# Altium PCB PCB-Powermodule-v11.0.0.PcbDoc (part 5 of 5)
Units mil, origin at the board's own origin, x right, y up, seen from the top; angles counter-clockwise.
Board outline 3031.5 x 1495.87 mil, 4 copper layers (Top Layer, Ground, Power, Bottom Layer), stack 61.653 mil thick; 227 components, 160 nets, 893 pads, 326 vias.
Unrouted connection lines stored in the file: 45.
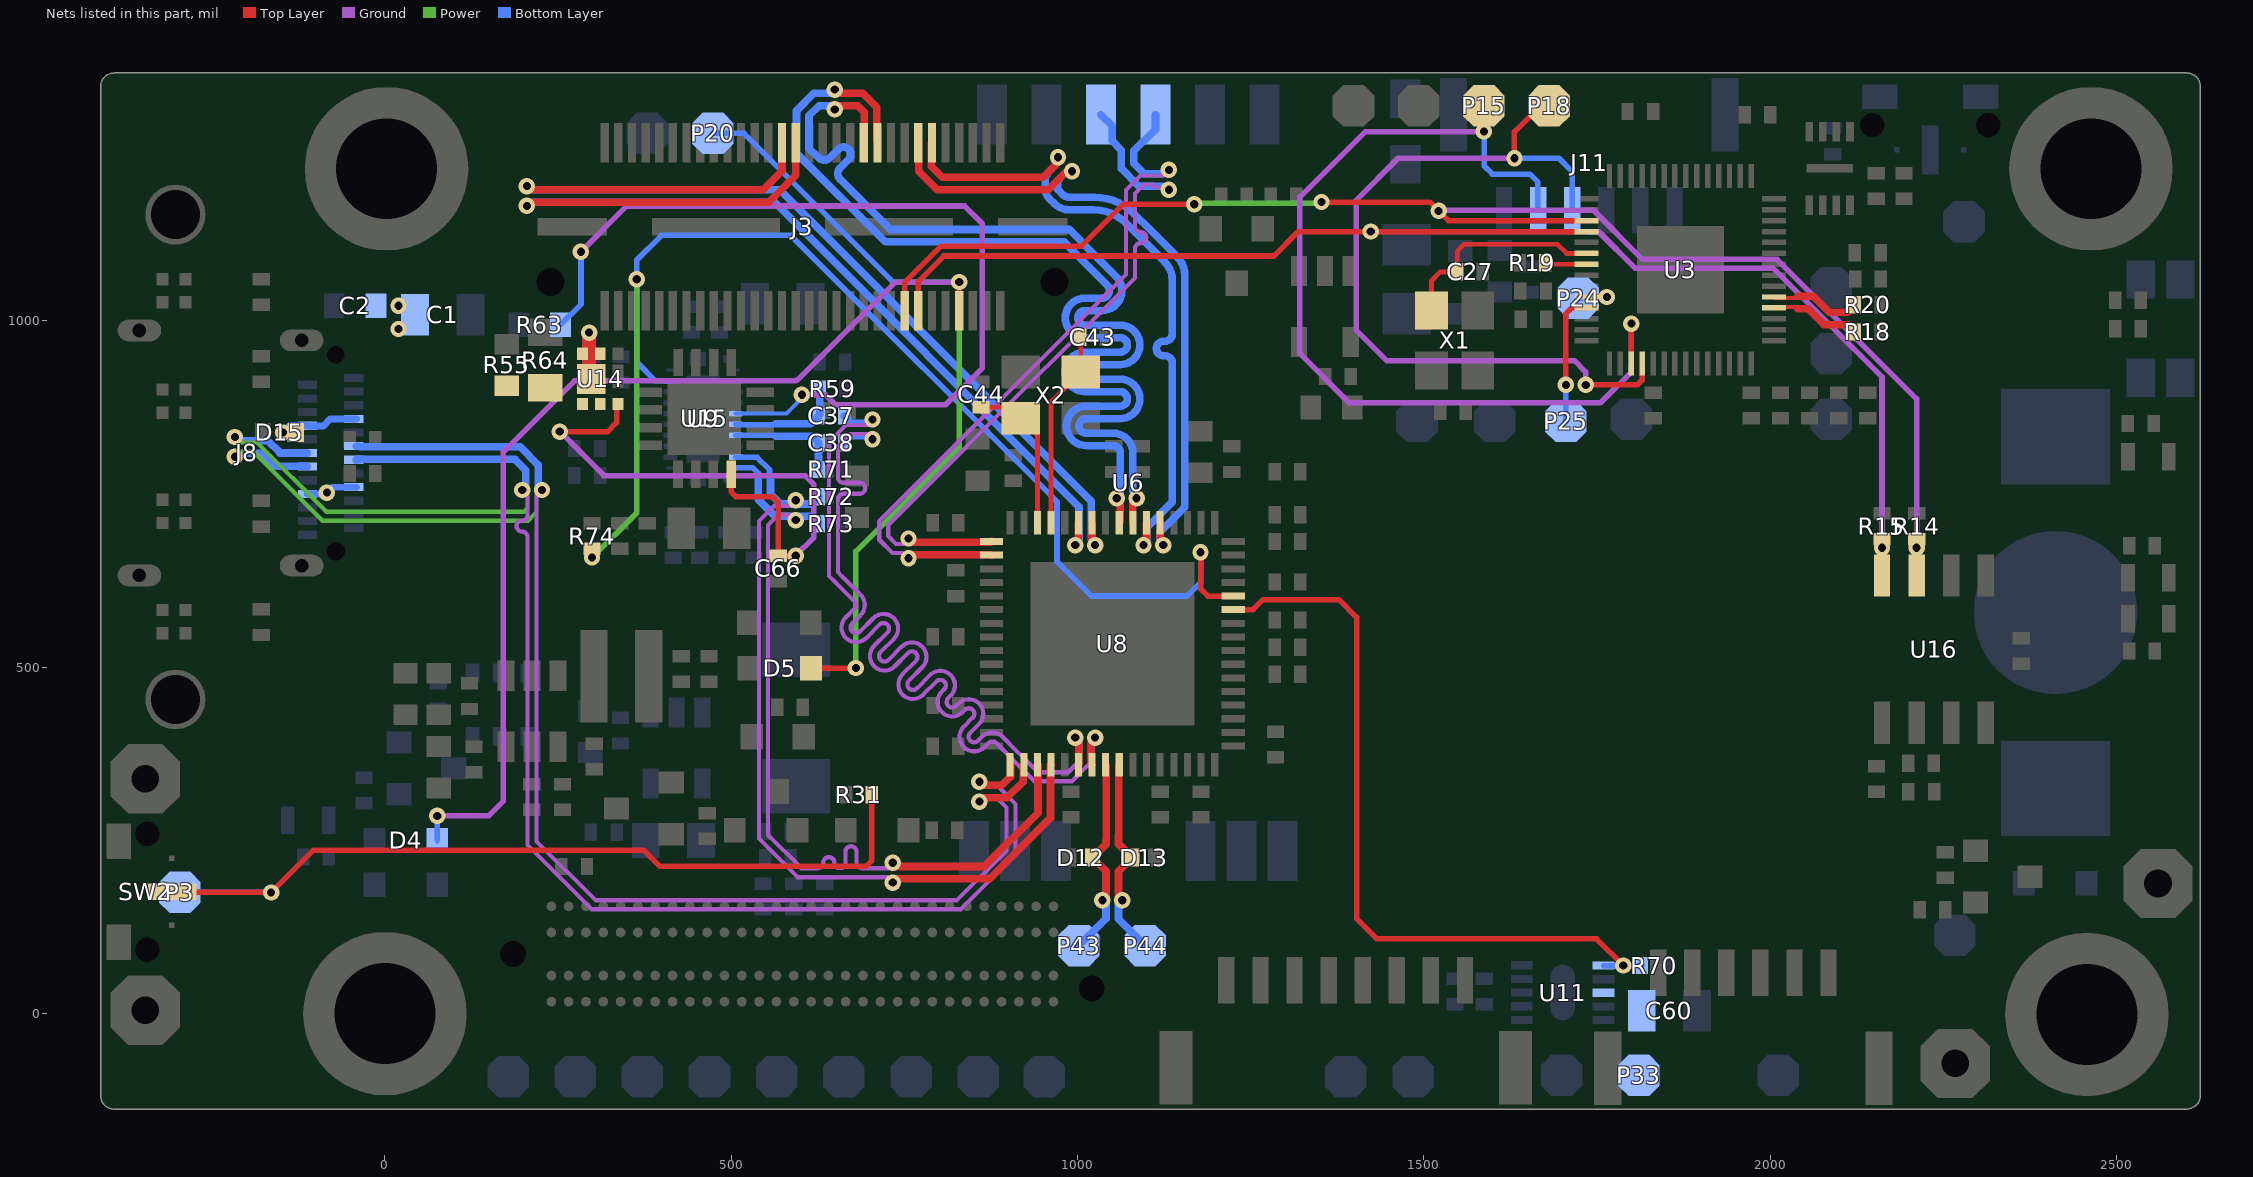
[diagram p5: the nets of this part, all layers, seen from the top]

## Via types
v1: diameter 23.62, hole 11.81, Top Layer to Bottom Layer, tented both sides, 326 vias

## Nets (pads, with @x,y where several pads share a name; then routed paths per layer and width w, separated by ;. In a path a pad name is that pad's centre, name@x,y a point inside that pad or via, vN(x,y) a via of type N, cw(c..) or ccw(c..) an arc to the next point about the centre after c; other vN are vias at no path point) (continued)
SCL0: J11.3 P18.1 U3.32 | length 1171.7
  Top Layer w8: v1(1630.78,1234.96) 1630.78,1273.16 1668.13,1310.5 P18.1@1680.78,1310.5 ; v1(1733.62,907.75) 1808.42,907.75 1809.46,908.8 1809.46,909.27 1814.74,914.55 1815.22,914.55 U3.32@1815.22,938.69
  Ground w8: v1(1630.78,1234.96) 1462.84,1234.96 1402.43,1174.55 1402.43,986.47 1446.09,942.81 1717.15,942.81 1733.62,926.34 v1(1733.62,907.75)
  Bottom Layer w8: v1(1630.78,1234.96) 1694.91,1234.96 1714.1,1215.77 J11.3@1714.1,1164.02
SCL_VOXL: J3.13 R15.1 U3.18 U16.8 | length 2109.6
  Top Layer w8: J3.13@770.1,1014.6 770.1,1056.82 807.12,1093.84 1283.34,1093.84 1318.32,1128.82 1423.15,1128.82 v1@1423.36,1129.04 ; v1(1423.24,1129.17) v1@1423.36,1129.04 ; U3.18@1734.98,1129.17 1423.49,1129.17 v1@1423.36,1129.04
  Ground w8: v1(1423.24,1129.17) 1423.49,1129.17 v1@1423.49,1128.82 ; v1@1423.49,1128.25 v1@1423.49,1128.82 ; v1(2161.39,672.71) 2161.39,919.23 2004.64,1075.98 1805.33,1075.98 1752.48,1128.82 v1@1423.49,1128.82
SDA0: J11.2 P15.1 U3.31 | length 1399.1
  Top Layer w8: v1(1586.64,1273.5) P15.1@1586.64,1310.5 ; U3.31@1799.47,938.69 1799.53,938.76 v1(1799.53,996.17)
  Ground w8: v1(1586.64,1273.5) 1415.42,1273.5 1321,1179.08 1321,953.1 1392.1,882 1755,882 1799.53,926.53 v1(1799.53,996.17)
  Bottom Layer w8: v1(1586.64,1273.5) 1587.16,1272.98 1587.16,1223.7 1598.77,1212.08 1652.96,1212.08 1664.44,1200.6 1664.44,1160.25 J11.2@1664.88,1159.82
SDA_VOXL: J3.15 R14.1 U3.17 U16.7 | length 2155.6
  Top Layer w8: J3.15@750.42,1014.6 750.42,1055.52 803.14,1108.25 1005.8,1108.25 1066.23,1168.67 v1(1168.39,1168.67) ; v1(1352.2,1171.77) 1508.53,1171.77 v1(1521.3,1159) 1535.39,1144.91 U3.17@1734.98,1144.91 ; U16.7@2211.39,632.68 v1(2211.39,672.71) R14.1@2211.39,685.21
  Ground w8: v1(1521.3,1159) 1522.4,1160.09 1744.48,1160.09 1815.6,1088.98 2010.02,1088.98 2211.39,887.61 v1(2211.39,672.71)
  Power w8: v1(1168.39,1168.67) 1169.93,1170.22 1350.65,1170.22 v1(1352.2,1171.77)
SW_PWR: P3.1 R31.1 SW2.2 | length 1276
  Top Layer w8: SW2.2@-307.48,176 -306.48,175 v1(-164.35,175) -103.61,235.74 374.05,235.74 397.29,212.5 694.52,212.5 702.93,220.91 R31.1@702.93,316.17
  Bottom Layer w8: P3.1@-296,175 v1(-164.35,175)
SWCLK: P24.1 U3.24 | length 68.8
  Top Layer w8: U3.24@1738.97,1034.68 v1(1764.17,1034.68)
  Bottom Layer w8: P24.1@1722.75,1033.15 1723.23,1032.68 1764.17,1032.68 v1(1764.17,1034.68)
SWDIO: P25.1 U3.25 | length 189.1
  Top Layer w8: v1(1705,907.75) 1705,1010.71 1713.22,1018.93 U3.25@1734.98,1018.93
  Bottom Layer w8: P25.1@1705,855 v1(1705,907.75)
TPS2591_G: C66.2 U14.3 U15.4 | length 828.6
  Top Layer w8: v1(252.53,840.28) 252.84,839.96 321.12,839.96 334.53,853.37 U14.3@334.53,880.12 ; U15.4@499.95,778.68 499.95,753.12 506.56,746.51 559.97,746.51 567.82,738.66 C66.2@567.82,661.18 v1(593.06,661.18)
  Ground w8: v1(252.53,840.28) 316.09,776.71 606.55,776.71 619.24,764.02 619.24,687.36 v1(593.06,661.18)
USB3_RX0_N: C37.1 U8.23 | length 1263.1
  Top Layer w11: U8.23@1020.85,359.37 1020.01,360.21 1020.01,393.24 v1(1025.32,398.55)
  Ground w6: v1(704,857.87) 696.19,850.05 665.95,850.05 641.06,825.16 641.06,632.01 650.25,622.82 655.06,618.01 677.44,595.63 cw(c671.82,589.94) 677.47,584.28 665.42,572.23 ccw(c680.25,557.36) 665.4,542.51 ccw(c680.25,557.36) 695.1,542.51 714.27,561.68 cw(c719.9,556) 725.56,550.34 706.44,531.22 ; 706.41,531.19 ccw(c721.26,516.35) 706.41,501.5 ccw(c721.26,516.35) 736.11,501.5 755.28,520.67 cw(c760.91,514.99) 766.57,520.64 cw(c760.91,514.99) 766.57,509.33 747.45,490.21 ; 747.4,460.5 cw(c762.27,475.33) 747.42,490.18 ; 747.44,460.47 ccw(c762.27,475.33) 777.12,460.48 796.29,479.66 cw(c801.92,473.97) 807.58,479.63 cw(c801.92,473.97) 807.58,468.32 804.21,464.94 ; 804.16,435.24 cw(c819.03,450.07) 804.18,464.92 ; 804.2,435.2 ccw(c819.03,450.07) 833.88,435.22 837.3,438.64 cw(c842.94,432.96) 848.59,438.62 cw(c842.94,432.96) 848.59,427.31 835.82,414.53 ccw(c850.66,399.68) 835.8,384.85 ; 835.83,384.81 ccw(c850.66,399.68) 865.51,384.83 871.22,390.54 cw(c876.88,384.88) 882.55,390.52 904.28,368.79 909.09,363.98 937.57,335.5 991.89,335.5 1017.51,361.12 1017.51,390.74 v1(1025.32,398.55)
  Bottom Layer w11: C37.1@663.06,862.89 673.39,852.55 698.69,852.55 v1(704,857.87)
USB3_RX0_P: C38.1 U8.22 | length 1263.7
  Top Layer w11: v1(996.7,398.55) 1002.01,393.24 1002.01,360.21 U8.22@1001.17,359.37
  Ground w6: v1(704,829.24) 696.19,837.05 671.34,837.05 654.06,819.78 654.06,804.7 654.06,774.48 ccw(c662.06,774.48) 662.06,766.48 685.4,766.48 cw(c685.4,758.48) 685.4,750.48 662.06,750.48 ccw(c662.06,742.48) 654.06,742.48 654.06,723.48 654.06,637.4 659.44,632.01 664.26,627.2 686.67,604.79 688.57,602.88 688.57,602.6 cw(c671.82,589.94) 686.67,575.09 674.57,562.99 ccw(c680.25,557.36) 674.59,551.7 ccw(c680.25,557.36) 685.9,551.7 705.02,570.82 ; 705.05,570.85 cw(c719.9,556) 732.56,572.75 732.85,572.75 734.74,570.85 ; 734.75,570.84 736.65,568.94 736.65,568.66 cw(c719.9,556) 734.75,541.15 715.58,521.98 ccw(c721.26,516.35) 715.6,510.69 ccw(c721.26,516.35) 726.92,510.69 746.04,529.81 cw(c760.91,514.99) 775.76,529.84 cw(c760.91,514.99) 775.76,500.14 756.59,480.97 ccw(c762.27,475.33) 767.93,469.68 787.05,488.8 cw(c801.92,473.97) 816.77,488.82 cw(c801.92,473.97) 816.77,459.13 813.35,455.7 ccw(c819.03,450.07) 824.69,444.41 828.06,447.79 ; 828.09,447.81 cw(c842.94,432.96) 857.78,447.81 cw(c842.94,432.96) 857.78,418.11 845.01,405.34 ccw(c850.66,399.68) 856.32,394.02 862.03,399.73 cw(c876.88,384.88) 889.54,401.63 889.82,401.63 891.72,399.73 913.47,377.98 918.28,373.17 942.95,348.5 986.51,348.5 1004.51,366.5 1004.51,390.74 v1(996.7,398.55)
  Bottom Layer w11: C38.1@663.06,824.22 673.39,834.55 698.69,834.55 v1(704,829.24)
USB3_RX0C_N: C37.2 R59.1 U9.6 | length 164.6
  Bottom Layer w8: U9.6@506.54,850.67 506.91,850.29 563.17,850.29 564.67,851.79
  Bottom Layer w11: 564.67,851.79 614.96,851.79 C37.2@626.06,862.89 627.8,864.63 R59.1@627.8,901.85
USB3_RX0C_P: C38.2 R71.1 U9.7 | length 162.8
  Bottom Layer w8: U9.7@506.54,834.92 506.91,835.29 563.17,835.29 564.67,833.79
  Bottom Layer w11: 564.67,833.79 616.48,833.79 C38.2@626.06,824.22 R71.1@626.06,785.7
USB3_TX0_N: R72.1 U8.20 U9.9 | length 1263.1
  Top Layer w11: v1(733.27,189.19) 738.58,194.5 872.94,194.5 960.95,282.52 960.95,358.53 U8.20@961.8,359.37
  Ground w6: v1(593.06,741.16) 585.25,733.35 562.44,733.35 540.1,711.01 540.1,252.7 595.8,197 725.46,197 v1(733.27,189.19)
  Bottom Layer w8: U9.9@506.54,803.42 506.91,803.04 537.49,803.04 555.23,785.31 555.23,772.15 556.73,770.65
  Bottom Layer w11: 556.73,770.65 556.73,749.75 570.64,735.85 587.75,735.85 v1(593.06,741.16) 598.37,735.85 615.87,735.85 R72.1@626.24,746.22
USB3_TX0_P: R73.1 U8.19 U9.10 | length 1263.1
  Top Layer w11: v1(733.27,217.81) 738.58,212.5 865.49,212.5 942.95,289.97 942.95,358.53 U8.19@942.11,359.37
  Ground w6: v1(593.06,712.54) 585.25,720.35 567.82,720.35 553.1,705.63 553.1,258.08 601.18,210 613.5,210 624.87,210 ccw(c624.87,218) 632.87,218 cw(c640.87,218) 648.87,218 ccw(c656.87,218) 664.87,218 664.87,233.7 cw(c672.87,233.7) 680.87,233.7 680.87,218 ccw(c688.87,218) 688.87,210 707.87,210 725.46,210 v1(733.27,217.81)
  Bottom Layer w8: U9.10@506.54,787.67 506.91,788.04 531.28,788.04 540.23,779.09 540.23,772.15 538.73,770.65
  Bottom Layer w11: 538.73,770.65 538.73,742.3 563.18,717.85 587.75,717.85 v1(593.06,712.54) 598.37,717.85 615.87,717.85 R73.1@626.24,707.48
USB-WIFI_N: U6.3 U8.2 | length 1045.2
  Top Layer w11: v1(756,657.46) 761.31,662.77 874.93,662.77 U8.2@875.77,661.93
  Ground w6: v1(756,657.46) 748.19,665.27 732.62,665.27 713.7,684.19 713.7,710.95 1069.99,1067.25 1069.99,1189.21 1090.84,1210.06 1124.07,1210.06 1131.88,1217.87 v1(1131.88,1218.11)
  Bottom Layer w11: U6.3@1112.46,1297.87 1112.46,1276.21 1096.31,1260.06 1095.33,1260.06 1081.09,1245.82 1081.09,1227.69 1095.99,1212.79 1123.15,1212.79 1128.46,1218.11 v1(1131.88,1218.11)
USB-WIFI_P: U6.4 U8.1 | length 1048.8
  Top Layer w11: v1(756,686.08) 761.31,680.77 874.93,680.77 U8.1@875.77,681.62
  Ground w6: v1(756,686.08) 748.19,678.27 738,678.27 726.7,689.58 726.7,705.57 950.93,929.8 958.54,937.41 1082.99,1061.86 1082.99,1085.36 1082.99,1104.36 cw(c1090.99,1104.36) 1090.99,1112.36 1091.16,1112.36 ccw(c1091.16,1120.36) 1091.16,1128.36 1090.99,1128.36 cw(c1090.99,1136.36) 1082.99,1136.36 1082.99,1183.53 1082.99,1183.83 1096.22,1197.06 1108.07,1197.06 1112.27,1192.85 1128.51,1192.85 v1(1131.88,1189.48)
  Bottom Layer w11: U6.4@1033.72,1297.87 1049.88,1281.71 1049.88,1259.97 1063.09,1246.75 1063.09,1220.23 1088.53,1194.79 1123.15,1194.79 1128.46,1189.48 v1(1131.88,1189.48)
USB_D_N: R18.1 U3.46 | length 132.2
  Top Layer w6: U3.46@2005.69,1018.93 2007.06,1020.3 2037.01,1020.3 2039.51,1017.8
  Top Layer w11: 2039.51,1017.8 2054.65,1017.8 2077.71,994.74 2111.83,994.74 R18.1@2122.33,984.24
USB_D_P: R20.1 U3.47 | length 132.2
  Top Layer w6: U3.47@2005.69,1034.68 2007.06,1033.3 2037.01,1033.3 2039.51,1035.8
  Top Layer w11: 2039.51,1035.8 2062.1,1035.8 2085.17,1012.74 2111.83,1012.74 R20.1@2122.33,1023.24
USB_FLT2: R70.2 U8.43 U11.6 | length 1097.6
  Top Layer w8: U8.43@1224.99,583.19 1253.38,583.19 1267.95,597.76 1377.24,597.76 1403,572 1403,137.13 1432.13,108 1749.39,108 v1(1787.93,69.45)
  Bottom Layer w8: U11.6@1759.39,69.45 v1(1787.93,69.45) R70.2@1814.43,69.45
USB_HDR_D_N: D13.1 P44.1 U8.25 | length 304.3
  Top Layer w11: 1059.11,257.78 1059.11,244.93 D13.1@1078.87,225.17 1059.11,205.4 1059.11,163.71 v1(1064.42,163.71) ; 1059.38,257.78 1059.38,358.53 U8.25@1060.22,359.37
  Bottom Layer w11: 1058.92,136.97 P44.1@1097.62,98.27 ; 1059.11,137.16 1059.11,163.71 v1(1064.42,163.71)
USB_HDR_D_P: D12.1 P43.1 U8.24 | length 304.7
  Top Layer w11: v1(1035.79,163.71) 1041.11,163.71 1041.11,205.4 D12.1@1021.34,225.17 1041.11,244.93 1041.11,250.33 1041.38,250.6 1041.38,358.53 U8.24@1040.54,359.37
  Bottom Layer w11: P43.1@1001.85,98.27 1040.73,137.16 ; v1(1035.79,163.71) 1041.11,163.71 1041.11,137.16
USBC_D_N: J8.A7 J8.B7 U8.18 | length 2412.9
  Top Layer w11: v1(858.27,306.17) 863.58,311.48 898.08,311.48 921.58,334.99 921.58,358.53 U8.18@922.43,359.37
  Ground w6: v1(226.86,756.04) 219.05,748.23 219.05,248.58 303.82,163.81 826.19,163.81 897.38,235.01 897.38,297.42 880.83,313.98 866.08,313.98 v1(858.27,306.17)
  Power w6: v1(-216.55,803.92) -208.74,811.73 -190.07,811.73 -89.98,711.65 206.44,711.65 215.24,720.46 219.05,724.26 219.05,730.5 219.05,748.23 v1(226.86,756.04)
  Bottom Layer w11: v1(-216.55,803.92) -211.24,809.23 -176.57,809.23 -157.82,790.48 -112.59,790.48 J8.B7@-111.93,789.82 ; J8.A7@-41.29,819.07 -36.85,819.07 -36.11,818.32 195.24,818.32 221.55,792.02 221.55,761.35 v1(226.86,756.04)
USBC_D_P: J8.A6 J8.B6 U8.17 | length 2413.9
  Top Layer w11: v1(858.27,334.79) 863.58,329.48 890.62,329.48 903.58,342.44 903.58,358.53 U8.17@902.74,359.37
  Ground w6: v1(198.24,756.04) 206.05,748.23 206.05,738.94 206.05,719.94 cw(c198.05,719.94) 198.05,711.94 ccw(c198.05,703.94) 198.05,695.94 cw(c198.05,687.94) 206.05,687.94 206.05,627.64 206.05,243.2 298.43,150.81 831.57,150.81 910.38,229.62 910.38,302.81 886.21,326.98 866.08,326.98 v1(858.27,334.79)
  Power w6: v1(-216.55,832.54) -208.74,824.73 -184.68,824.73 -84.6,724.65 201.05,724.65 206.05,729.65 206.05,730.5 206.05,748.23 v1(198.24,756.04)
  Bottom Layer w11: v1(-216.55,832.54) -211.24,827.23 -169.11,827.23 -151.38,809.5 J8.B6@-111.93,809.5 ; J8.A6@-41.29,799.39 -40.61,800.07 -35.91,800.07 -35.65,800.32 187.79,800.32 203.55,784.56 203.55,761.35 v1(198.24,756.04)
VBUS1: C1.2 C2.1 D15.2 J8.A4 J8.A9 J8.B4 J8.B9 R55.1 R64.1 U14.1 U14.2 U14.5 U14.6 U14.8 | length 274.4
  Top Layer w10: v1(-147.08,839.03) v1(-147.08,839.03) D15.2@-128.71,839.09
  Top Layer w20: v1(294.76,983.27) 294.76,919.82 U14.8@298.14,916.44
  Bottom Layer w10: v1(-147.08,839.03) -137.24,848.87 J8.B4@-111.93,848.87 ; J8.B9@-111.93,750.18 v1@-83.79,750.18 ; J8.B4@-111.93,848.6 -88.93,848.6 -79.09,858.44 J8.A9@-41.29,858.44 ; v1(-83.79,752.23) v1(-83.79,752.23) -75.95,760.02 J8.A4@-41.29,760.02
  other v1: 19.54,988.48 19.54,1022
VBUS2: C60.2 P33.1 U11.8
VBUS_DET: R63.2 U9.5 | length 1343.2
  Ground w8.17: v1(283,1100) 348.99,1165.99 837.01,1165.99 862.52,1140.48 862.52,932.22 809.3,879 650.45,879 636.18,893.27 601.99,893.27 v1(601.99,893.4)
  Bottom Layer w6: U9.5@506.54,866.41 579.69,866.41 604.27,890.99 601.99,893.27 v1(601.99,893.4)
  Bottom Layer w8.17: R63.2@253.61,994.56 283,1023.95 v1(283,1100)
VCON_FLT: R74.2 U8.44 U9.24 | length 1899.1
  Top Layer w8: v1@299.07,654.77 v1(299.07,658.51) R74.2@299.07,667.27 ; v1(1177.56,666.25) 1177.56,613.44 1188.12,602.88 U8.44@1224.99,602.88
  Power w8: v1(299.07,658.51) 363.57,723.01 v1(363.57,1060.18)
  Bottom Layer w8: U9.24@412.06,913.66 390.63,913.66 363.57,940.72 v1(363.57,1060.18) 363.57,1088.02 399.04,1123.49 585.9,1123.49 970.3,739.1 970.3,652.71 1020.01,603 1157.83,603 1177.56,622.73 v1(1177.56,666.25)
VOXL_EN_BUCK: D4.2 D5.2 J3.07 P20.1 | length 2573.8
  Top Layer w8: D5.2@615.04,498.74 679.74,498.74 v1(680,499) ; J3.07@829.12,1014.63 v1@829.12,1056.2
  Ground w8: v1@75.55,286 150,286 171.02,307.02 171.02,811.06 273.62,913.66 592.82,913.66 593.37,914.21 595,914.21 737.03,1056.24 v1(829.09,1056.24)
  Power w8: v1(680,499) 680,667.39 829.16,816.55 829.16,1056.17 v1(829.09,1056.24)
  Bottom Layer w8: D4.2@75.55,250 v1(75.55,285.5) ; P20.1@473.35,1270.88 518.54,1270.88 733.25,1056.17 829.03,1056.17 v1(829.09,1056.24)
VOXL_USB_N: J3.12 U8.54 | length 999
  Top Layer w11: J3.12@789.79,1257.59 788.94,1256.75 788.94,1223.42 804.89,1207.48 950.35,1207.48 971.81,1228.94 v1(971.81,1236.45) ; v1(1095.12,676.5) 1099.59,680.97 U8.54@1099.59,708.58
  Bottom Layer w11: v1(971.81,1236.45) cw(c953.67,1236.45) 966.49,1223.63 958.44,1215.57 958.4,1215.53 ccw(c971.02,1202.9) 953.17,1202.9 953.17,1190.98 ccw(c973.26,1190.98) 959.05,1176.77 966.05,1169.78 ccw(c988.14,1191.87) 988.06,1160.63 ccw(c988.14,1191.87) 988.14,1160.63 1022.75,1160.63 cw(c1022.75,1093.81) 1069.97,1141.09 ; 1069.99,1141.06 1125.71,1085.35 ; v1(1095.12,676.5) 1100.43,681.81 1100.43,702.23 1136.88,738.68 1136.88,933.3 1136.88,938.81 ccw(c1125.88,938.81) 1125.88,949.81 1124.25,949.81 cw(c1124.25,960.31) 1124.25,970.81 1125.88,970.81 ccw(c1125.88,981.81) 1136.88,981.81 1136.88,1019.75 1136.88,1058.37 ccw(c1098.73,1058.37) 1125.73,1085.33
VOXL_USB_P: J3.14 U8.53 | length 1002.7
  Top Layer w11: J3.14@770.1,1257.59 770.94,1256.75 770.94,1215.97 797.43,1189.48 957.8,1189.48 984.53,1216.21 v1(992.04,1216.21) ; U8.53@1119.28,708.58 1119.28,680.97 v1(1123.75,676.5)
  Bottom Layer w11: 979.21,1210.88 971.17,1202.84 971.17,1191.02 ccw(c973.35,1191.02) 971.81,1189.48 978.75,1182.53 ccw(c988.17,1191.95) 988.17,1178.63 996.48,1178.63 1024.57,1178.63 cw(c1024.57,1098.22) 1081.43,1155.08 1104.04,1132.47 1143.71,1092.81 cw(c1116.73,1065.83) 1154.88,1065.83 1154.88,731.22 1118.43,694.78 1118.43,681.81 v1(1123.75,676.5) ; 979.22,1210.9 cw(c992.04,1198.08) v1(992.04,1216.21)
VOXL_USB_SSRX_N: J3.32 U8.59 | length 1526.3
  Top Layer w11: v1(205,1166.17) 210.31,1171.48 553.94,1171.48 592.94,1210.48 J3.32@592.94,1257.59 ; v1(996.7,676.5) 1001.17,680.97 U8.59@1001.17,708.58
  Bottom Layer w11: v1(205,1166.17) 210.31,1171.48 562.52,1171.48 1002.01,731.99 1002.01,685.22 996.7,679.91 v1(996.7,676.5)
VOXL_USB_SSRX_P: J3.34 U8.58 | length 1525.6
  Top Layer w11: v1(205,1194.79) 210.31,1189.48 546.48,1189.48 573.25,1216.25 J3.34@573.25,1257.59 ; U8.58@1020.85,708.58 1020.85,680.97 v1(1025.32,676.5)
  Bottom Layer w11: v1(205,1194.79) 210.31,1189.48 238.61,1189.48 314.56,1189.48 569.97,1189.48 1020.01,739.45 1020.01,685.22 1025.32,679.91 v1(1025.32,676.5)
VOXL_USB_SSTX_N: J3.20 U8.56 | length 1525.8
  Top Layer w11: v1(649.5,1334.1) 654.81,1328.79 690.03,1328.79 710.2,1308.61 710.2,1258.43 J3.20@711.05,1257.59 ; v1(1056.6,744.05) 1061.91,738.74 1061.91,710.27 U8.56@1060.22,708.58
  Bottom Layer w11: v1(649.5,1334.1) 644.19,1328.79 619.37,1328.79 594.24,1303.66 594.24,1242.28 722.36,1114.17 980.44,1114.17 1007.31,1087.3 1042.75,1051.86 cw(c1035.01,1044.05) 1035.01,1033.05 1010.81,1033.05 ccw(c1010.81,1004.55) 982.31,1004.55 ccw(c1010.81,1004.55) 1010.81,976.05 1061.41,976.05 cw(c1061.41,965.55) 1071.91,965.55 cw(c1061.41,965.55) 1061.41,955.05 1010.81,955.05 ccw(c1010.81,926.55) 982.31,926.55 ccw(c1010.81,926.55) 1010.81,898.05 1061.41,898.05 cw(c1061.41,887.55) 1071.91,887.55 cw(c1061.41,887.55) 1061.41,877.05 1012.58,877.05 ccw(c1012.58,848.55) 984.08,848.55 ccw(c1012.58,848.55) 1012.58,820.05 1050.91,820.05 cw(c1050.91,809.05) 1061.91,809.05 1061.91,769.48 1061.91,749.36 v1(1056.6,744.05)
VOXL_USB_SSTX_P: J3.22 U8.55 | length 1525.3
  Top Layer w11: v1(649.5,1305.47) 654.81,1310.79 682.57,1310.79 692.2,1301.15 692.2,1258.43 J3.22@691.36,1257.59 ; U8.55@1079.91,708.58 1079.91,738.74 v1(1085.22,744.05)
  Bottom Layer w11: v1(649.5,1305.47) 644.19,1310.79 626.83,1310.79 612.24,1296.2 612.24,1259.24 612.24,1249.74 626.53,1235.45 ccw(c634.31,1243.23) 642.09,1235.45 654.82,1248.19 cw(c662.25,1240.76) 669.67,1248.19 cw(c662.25,1240.76) 669.67,1233.34 656.94,1220.6 ccw(c664.71,1212.82) 656.94,1205.05 671.79,1190.2 675.68,1186.31 729.81,1132.17 987.9,1132.17 1032.77,1087.3 1058.15,1061.92 1058.15,1061.53 cw(c1035.01,1044.05) 1035.01,1015.05 1010.81,1015.05 ccw(c1010.81,1004.55) 1000.31,1004.55 ccw(c1010.81,1004.55) 1010.81,994.05 1061.41,994.05 cw(c1061.41,965.55) 1089.91,965.55 cw(c1061.41,965.55) 1061.41,937.05 1010.81,937.05 ccw(c1010.81,926.55) 1000.31,926.55 ccw(c1010.81,926.55) 1010.81,916.05 1061.41,916.05 cw(c1061.41,887.55) 1089.91,887.55 cw(c1061.41,887.55) 1061.41,859.05 1012.58,859.05 ccw(c1012.58,848.55) 1002.08,848.55 ccw(c1012.58,848.55) 1012.58,838.05 1050.91,838.05 cw(c1050.91,809.05) 1079.91,809.05 1079.91,769.48 1079.91,755.12 1080.91,754.12 1080.91,748.36 v1(1085.22,744.05)
XI: C44.2 U8.62 X2.3 | length 218.4
  Top Layer w7: C44.2@864.63,875.51 X2.3@922.07,875.51 ; X2.3@917.98,859.59 942.11,835.46 U8.62@942.11,708.58
XIN: C27.1 U3.20 X1.1 | length 311.8
  Top Layer w7: X1.1@1510.96,1015.37 1510.96,1058.41 1523.42,1070.88 C27.1@1548.11,1070.88 1548.11,1100.96 1557.96,1110.81 1692.84,1110.81 1705.98,1097.67 U3.20@1734.98,1097.67
XO: C43.2 U8.61 X2.1 | length 285.8
  Top Layer w7: U8.61@961.8,708.58 961.8,883.72 X2.1@1004.6,926.52 C43.2@1004.6,976.69
XOUT: R19.1 U3.21 | length 60.7
  Top Layer w7: R19.1@1675.16,1084.02 1677.26,1081.92 U3.21@1734.98,1081.92
pads on no net: J1.MP1 J1.MP2 J2. J2.A05 J2.A06 J2.A10 J2.A11 J2.A12 J2.A14 J2.A16 J2.A17 J2.A18 J2.A19 J2.A20 J2.A21 J2.A23 J2.A25 J2.A26 J2.A28 J2.A29 J2.B07 J2.B08 J2.B09 J2.B10 J2.B16 J2.B17 J2.B20 J2.B21 J2.B28 J2.B29 J2.C05 J2.C06 J2.C07 J2.C08 J2.C09 J2.C10 J2.C12 J2.C13 J2.C18 J2.C19 J2.C20 J2.C24 J2.C28 J2.C29 J2.C30 J2.D05 J2.D06 J2.D07 J2.D08 J2.D09 J2.D10 J2.D11 J2.D13 J2.D14 J2.D16 J2.D17 J2.D19 J2.D20 J2.D22 J2.D23 J2.D25 J2.D26 J2.D29 J2.D30 J3. J3.02 J3.03 J3.04 J3.05 J3.06 J3.08 J3.16 J3.23 J3.24 J3.25 J3.26 J3.27 J3.28 J3.29 J3.30 J3.33 J3.35 J3.37 J3.38 J3.39 J3.40 J3.41 J3.42 J3.43 J3.45 J3.46 J3.47 J3.48 J3.50 J3.51 J3.52 J3.53 J3.54 J3.55 J3.56 J3.57 J3.60 J8. J8.A8 J8.B8 J10.MH1 J10.MH2 J11.6 J11.MP1 J11.MP2 J12.MP1 J12.MP2 SW2. SW2.S1 SW2.S2 SW3. SW3.S1 SW3.S2 U2.1 U3.7 U3.9 U3.15 U3.27 U3.28 U3.40 U3.41 U6.1 U6.6 U6.8 U6.11 U8.3 U8.4 U8.6 U8.7 U8.11 U8.12 U8.14 U8.15 U8.26 U8.27 U8.29 U8.30 U8.32 U8.33 U8.35 U8.36 U8.37 U8.38 U8.39 U8.46 U8.47 U8.49 U8.60 U9.3 U9.25 U9.26 U11.7 U11.9 U11.10 U13.1 U16.4

## Polygon pours and split planes (outlines as drawn)
GND on Bottom Layer "GND_L04_P091" (solid, remove dead copper, pour order 91): -410.5,-118.11 -410.5,1338.39 cw(c-390.81,1338.39) -390.81,1358.07 2601,1358.07 2601.32,1358.07 cw(c2601.32,1338.39) 2621,1338.39 2621,-118.31 2621,-118.11 cw(c2601.32,-118.11) 2601.32,-137.8 -390.81,-137.79 cw(c-390.81,-118.11)
+5V on Bottom Layer "+5V_L04_P083" (solid, remove dead copper, pour order 83): 2381.78,227.19 2381.78,116.9 2330,116.9 2330,-126 2189,-126 2189,227.19
+5V_ESC on Bottom Layer "+5V_ESC_L04_P090" (solid, remove dead copper, pour order 90): -186,368.5 -103.75,368.5 -103.75,452 137,452 137,534.18 -410.5,534.18 -410.5,285 -186,285
+5V on Bottom Layer "+5V_L04_P070" (solid, remove dead copper, pour order 70): 257.02,-12.33 317.36,48.01 317.36,210.11 257.52,210.11 257.52,536.01 156.02,536.01 156.02,322.1 99.37,322.1 99.37,-12.33
+3V3 on Bottom Layer "+3V3_L04_P074" (solid, remove dead copper, pour order 74): 570.64,565.2 484,565.2 484,479.3 395.3,479.3 395.3,407.41 270.43,407.41 270.43,571.1 466.98,571.1 466.98,620.42 516.8,620.42 516.8,673.51 570.64,673.51
NetL1_1 on Bottom Layer "NETL1_1_L04_P069" (solid, remove dead copper, pour order 69): 540.1,412.83 540.1,485.5 644.39,485.5 644.39,564.24 491.37,564.24 491.37,466.5 446.48,466.5 446.48,412.83
1V1 on Bottom Layer "1V1_L04_P068" (solid, remove dead copper, pour order 68): 434.44,278.91 434.44,212.5 558,212.5 558,288.65 753.97,288.65 753.97,367.39 476.46,367.39 476.46,278.91
+5V on Bottom Layer "+5V_L04_P063" (solid, remove dead copper, pour order 63): 499.54,935.21 499.54,937.68 589.3,1027.44 589.3,1088.02 506.54,1088.02 506.54,965 486.86,965 486.86,935.21
GND on Top Layer "GND_L01_P092" (solid, remove dead copper, pour order 92): -410.5,-118.11 -410.5,1338.39 cw(c-390.81,1338.39) -390.81,1358.07 2601,1358.07 2601.32,1358.07 cw(c2601.32,1338.39) 2621,1338.39 2621,-118.31 2621,-118.11 cw(c2601.32,-118.11) 2601.32,-137.8 -390.81,-137.79 cw(c-390.81,-118.11)
+5V_ESC on Top Layer "+5V_ESC_L01_P089" (solid, remove dead copper, pour order 89): 186.74,610.04 186.74,458.32 -45.74,458.32 -45.74,289 -410.5,289 -410.5,610.04
+1V1 on Top Layer "+1V1_L01_P012" (solid, remove dead copper, pour order 12): 1988.46,1077.98 1989.22,1078.74 2131.33,1078.74 2131.33,1114.73 2097.99,1114.73 2072.49,1089.23 1988.46,1089.23
+5V on Top Layer "+5V_L01_P064" (solid, remove dead copper, pour order 64): 200.22,571.1 481.24,571.1 481.24,798.36 398.05,798.36 398.05,680.01 321.12,680.01 321.12,667.5 200.22,667.5
+3V3 on Top Layer "+3V3_L01_P011" (solid, remove dead copper, pour order 11): 2131.65,1074.05 2109.29,1074.05 2105.36,1070.11 1960.2,1070.11 1960.2,1046.49 2131.65,1046.49
+3V3 on Power "+3V3_L03_P094" (solid, remove dead copper, pour order 94): -410.5,-118.11 -410.5,1338.39 cw(c-390.81,1338.39) -390.81,1358.07 2601,1358.07 2601.32,1358.07 cw(c2601.32,1338.39) 2621,1338.39 2621,-118.31 2621,-118.11 cw(c2601.32,-118.11) 2601.32,-137.8 -390.81,-137.79 cw(c-390.81,-118.11)
+5V_ESC on Power "+5V_ESC_L03_P080" (solid, remove dead copper, pour order 80): 1805.69,1358.07 1805.69,1290.29 2106.6,1290.29 2106.6,1137.04 1746.67,1137.04 1410.11,800.48 1258.21,800.48 1258.21,869 708.88,869 708.88,1112 252.7,1112 252.7,1039 -98.61,1039 -98.61,592 228.07,592 228.07,182 -410.5,182 -410.5,1358.07
+5V on Power "+5V_L03_P071" (solid, remove dead copper, pour order 71): 74.17,711.65 74.17,892.85 314.56,892.85 314.56,1104 702.93,1104 702.93,108 2317,108 2317,-139.99 -410.5,-139.99 -410.5,172 240.27,172 240.27,600.64 -89.79,600.64 -89.79,711.65
VBUS1 on Power "VBUS1_L03_P078" (solid, remove dead copper, pour order 78): -84.89,729.65 -161,805.75 -161,1039 260.06,1039 260.06,1104 314.22,1104 314.22,898.72 68.1,898.72 68.1,729.65
+1V1 on Power "+1V1_L03_P084" (solid, remove dead copper, pour order 84): 1705,1015.57 1764.94,1075.51 2131.65,1075.51 2131.65,1112.85 1740.67,1112.85 1658,1030.18 1658,958 1705,958
1V1 on Power "1V1_L03_P040" (solid, remove dead copper, pour order 40): 1077.67,789.48 923.38,789.48 923.38,701.17 702.93,701.17 702.93,291.38 768.97,291.38 768.97,384.53 874.33,384.53 874.33,291.38 1208.06,291.38 1208.06,782.48 1136.88,782.48 1136.88,723.28 1077.67,723.28
GND on Ground "GND_L02_P093" (solid, remove dead copper, pour order 93): -410.5,-118.11 -410.5,1338.39 cw(c-390.81,1338.39) -390.81,1358.07 2601,1358.07 2601.32,1358.07 cw(c2601.32,1338.39) 2621,1338.39 2621,-118.31 2621,-118.11 cw(c2601.32,-118.11) 2601.32,-137.8 -390.81,-137.79 cw(c-390.81,-118.11)

## Other copper
Top Layer:
  rectangle net +3V3: 1168.39,1190.89 1220.13,1245.19
  rectangle net +3V3: 1192.39,1115.1 1220.13,1240
  rectangle net NetQ9_1: 1239.13,1115.1 1283.34,1192.87
  region net +3V3: 2140.79,1125.23 2140.79,1181.37 2109.76,1181.37 2109.76,1125.23
  rectangle net +5V: 2201,-126 2330,81.9
  rectangle net +3V3: 2109.77,1125.23 2205.59,1185.21
  rectangle net +3V3: 2140.89,307.96 2221.2,338.6
  rectangle net +3V3: 2188.51,307.96 2221.2,450.59
  rectangle net NetJ9_1: 2249.58,736.46 2330,912
  rectangle net +3V3: 359.32,380.91 400.44,560.2
  rectangle net +3V3: 359.32,507 480.5,565.2
  rectangle net NetC10_1: 200.22,465.92 224.63,561.76
  rectangle net NetC10_1: 200.22,524.77 321.7,561.76
  rectangle net NetC10_1: 282.41,380.91 321.7,554.13
  region net NetLED1_1: 2528.97,510.96 2528.97,590.33 2503.97,590.33 2503.97,510.96
  region net NetLED2_1: 2503.97,687.95 2503.97,609.63 2528.97,609.63 2528.97,687.95
  region net SDA_VOXL: 2223.89,602.17 2223.89,694.21 2199.58,694.21 2199.58,602.17
  region net SCL_VOXL: 2173.89,602.17 2173.89,694.21 2149.58,694.21 2149.58,602.17
  region net NetJ9_1: 2276,602.17 2276,912 2249.58,912 2249.58,602.17
  region net +3V3: 2148.89,730.7 2148.89,712.71 2223.74,712.71 2223.74,730.7
  rectangle net +5V: 142.69,124.2 274.23,226
  rectangle net GND: 529.96,9.3 549.96,41.3
  rectangle net GND: 585.32,9.3 595.23,62.3
  rectangle net GND: 315.28,30.3 972.96,41.3
  rectangle net GND: 629.96,109.3 649.96,141.3
  rectangle net GND: 629.96,131 845.23,141.3
  rectangle net GND: 654.96,130.89 674.96,162.89
  rectangle net GND: 729.96,130.89 749.96,162.89
  rectangle net GND: 804.96,9.3 824.96,41.3
  rectangle net GND: 757.96,9.3 772.96,63.3
  rectangle net GND: 804.96,130.89 824.96,162.89
  rectangle net GND: 957.96,9.3 972.96,63.3
  rectangle net GND: 882.96,9.3 897.96,63.3
  rectangle net GND: 829.96,109.3 901.96,141.3
  rectangle net GND: 879.96,130.3 923.96,162.89
  rectangle net GND: 479.96,109.3 499.96,141.3
  rectangle net GND: 504.96,130.89 524.96,162.89
  rectangle net +5V: 142.69,8.3 274.23,39.41
  rectangle net GND: 379.96,9.3 399.96,41.3
  rectangle net GND: 281.96,30.3 373.96,104.01
  rectangle net +5V: 221,8.3 274.23,162
  rectangle net GND: 281.96,8.3 322.96,225
  rectangle net GND: 359.68,70.81 415.28,104.01
  region net GND: 524.96,141.18 309.68,141.18 309.68,130.89 524.96,130.89
  rectangle net 1V1: 811.58,531.55 836.79,611.88
  rectangle net NetU14_4: 324.91,898.72 353,961.78
  rectangle net NetU14_4: 324.91,920.22 481.44,961.78
  rectangle net +5V_ESC: 1381.6,857.48 1411.6,991.47
  rectangle net DIN#: 1296,961.31 1331.71,981.02
  rectangle net NetC58_2: 622.74,763.22 645.43,834.51
  rectangle net NetC58_2: 622.74,761.22 699.06,791.84
  rectangle net VBUS1: 277.47,871.16 318.81,904.08
  rectangle net VBUS1: 158.35,889.08 285.35,943.8
  rectangle net VBUS1: 277.47,871.16 318.81,961.71
  region net NetC28_1: 1616.39,897.66 1616.39,956.31 1557.76,956.31 1557.76,897.66
  region net GND: 2205.59,1203.45 2205.59,1226.33 2052.28,1226.33 2052.28,1203.45
  rectangle net NetR52_2: 1275.77,669.04 1293.79,732.55
  region net NetC28_1: 1571.21,857.2 1571.21,956.31 1551.42,956.31 1551.42,857.2
  region net GND: 1648.32,964.26 1648.32,1055.68 1630.83,1055.68 1630.83,964.26
  region net ADC_AVDD: 2022.91,887.55 2022.91,975.62 1999.98,975.62 1999.98,887.55
  region net ADC_AVDD: 2069.26,887.55 2069.26,905.55 2000.98,905.55 2000.98,887.55
  rectangle net +3V3: 837.88,735.84 926.43,784.48
Power:
  rectangle net NetJ9_1: 2345.2,373.19 2531.58,779
  rectangle net +3V3: 386.19,534.44 475.52,565.1
Bottom Layer:
  rectangle net NetLED5_1: -90.98,213.74 -71.29,298.75
  rectangle net GND: 408.66,383.3 432.7,456.14
  rectangle net GND: 412.66,383.3 495.37,407
  rectangle net VBUS1: -28,978.24 64.5,1043
  rectangle net +5V: 1532.54,-24.86 1608.36,36.3
  rectangle net +5V: 1532.54,4.67 1657.04,36.3
  rectangle net NetJ9_1: 2323.42,256.17 2500.58,426
  rectangle net NetJ9_1: 2249,738 2490.74,901.83
  region net VBUS2: 1834.43,34.49 1787.43,34.49 1787.43,-119.09 1834.43,-119.09
  region net VBUS2: 1834.43,36.99 1743.64,36.99 1743.64,22.03 1834.43,22.03
  rectangle net NetD4_1: -30.75,168.28 0.75,267.72
  rectangle net NetD4_1: -42.73,168.28 -15,312.6
  rectangle net EN_VOXL: 64.36,330.86 136.61,449.3
  rectangle net NetR51_2: 357.46,224.91 396.3,353.78
  rectangle net NetR51_2: 317,224.91 396.3,279
  rectangle net 1V1: 670.99,288.65 768.97,367.39
  pour cut-out: 722.7,1254.56 722.7,266.18 1424.7,266.18 1424.7,1254.56

## Silkscreen, mask and mechanical layers (free items; w line width, h text height)
Top Overlay:
  lines w5: -213.65,610.04 154.28,610.04
  text "SDA" at 1604,1205.26 h30 r90
  text "SCL" at 1697.78,1203.98 h30 r90
  text "GPIO1" at 1415.35,1186.24 h30 r90
  text "SBUS-TX" at 1507.47,1140.38 h30 r90
  text "HEARBEAT" at 2343.87,778.79 h30
  text "3V3" at 2405.97,603.62 h30
  text "+5V" at 2405.97,544.3 h30
  text "+5V ESC" at -283.43,315.26 h50
  text "FAN-" at 2585.5,253.41 h50 r90
  text "FAN+" at 2290.7,-11.05 h50 r90
  text "GND" at -284.45,-20.82 h50
  text "POWER MODULE V.11.0.0" at 218.72,-118.88 h77.48
Bottom Overlay:
  lines w5: 160.99,1071.5 191.16,1071.5 191.16,1015.56 193.55,1015.56 ; 277.06,235.74 277.54,235.26 352.46,235.26 ; 1993.86,1322.12 2017,1322.12 2017,1283.69
  text "J3_49" at 337.5,1255.43 h30
  text "VOXL EN BUCK" at 635.44,1246.7 h30
  text "GPIO0" at 2323.25,1061.02 h30
  text "GPIO6" at 2045.37,1029.68 h30
  text "SWCLK" at 1868.07,1017.18 h30
  text "GPIO23" at 2046.71,934.54 h30
  text "ADC1" at 1782.39,896.02 h30 r270
  text "SWDIO" at 1688,894.44 h30 r270
  text "ADC0" at 1472.97,892.6 h30 r270
  text "RUN" at 1585.5,892.6 h30 r270
  text "GPIO22" at 2046.62,839.4 h30
  text "+5V ESC" at -88.41,314.56 h50
  text "FAN-" at 2535.09,249.89 h50 r270
  text "SW-PWR" at -54.52,149.39 h50
  text "5V" at 2220.57,95.24 h30
  text "HDR_DP" at 959.18,81.16 h30
  text "HDR_DN" at 1253.67,81.16 h30
  text "FAN+" at 2324.92,-10.28 h50
  text "GND" at -176.27,-19.12 h50
  text "RX" at 1370.45,-50.07 h30 r270
  text "MOSI" at 646.22,-51.98 h30 r270
  text "SCLK" at 741.68,-51.98 h30 r270
  text "CS_N" at 839.73,-51.98 h30 r270
  text "+3V3" at 935.11,-51.98 h30 r270
  text "TX" at 1468.22,-51.98 h30 r270
  text "B11" at 161.04,-52.97 h30 r270
  text "B12" at 257.63,-52.98 h30 r270
  text "B13" at 354.28,-52.98 h30 r270
  text "B14" at 451.66,-52.97 h30 r270
  text "MISO" at 548,-52.97 h30 r270
  text "GND" at 1656.99,-106 h30
  text "VBUS2" at 1947.45,-106 h30
  text "GPIO2" at 2148.36,-106 h30
Dimensions:
  lines w5: -331.76,92.8 -223.35,92.8 -223.35,610.14 ; -331.76,610.14 -223.35,610.14 ; -223.35,1127.48 -223.35,610.14 ; 2424.54,39.23 1282.8,39.23 1282.8,1180.91 2424.54,1180.91
Board_outline:
  circle w5: c0,0 r72.87
  circle w5: c2463.02,1219.82 r72.87
  circle w5: c2.38,1219.82 r72.87
  circle w5: c2457.18,-1.21 r72.87
  lines w10: 2601,1358.07 -390.81,1358.07 ccw(c-390.81,1338.39) -410.5,1338.39 -410.5,-118.11 ccw(c-390.81,-118.11) -390.81,-137.8 2601.32,-137.8 ccw(c2601.32,-118.11) 2621,-118.11 ; 2601.32,1358.07 cw(c2601.32,1338.39) 2621,1338.39 2621,-118.31 ; 1437.21,137.4 1437.21,806.69 2106.5,806.69 2106.5,137.4 1437.21,137.4
Fabrication:
  drawing of 295 lines, arcs and shapes, not listed
  text "Layer" at 3070.09,1390 h60
  text "Name" at 3480,1390 h60
  text "Material" at 4409.74,1390 h60
  text "Thickness" at 5009.6,1390 h60
  text "Constant" at 5659.43,1390 h60
  text "Board Layer Stack" at 6229.29,1390 h60
  text "Top Overlay" at 3480,1270 h60
  text "Top Solder" at 3480,1150 h60
  text "SM-001" at 4409.74,1150 h60
  text "0.79mil" at 5009.6,1150 h60
  text "4" at 5659.43,1150 h60
  text "1" at 3070.09,1030 h60
  text "Top Layer" at 3480,1030 h60
  text "CF-004" at 4409.74,1030 h60
  text "1.38mil" at 5009.6,1030 h60
  text "Dielectric 1" at 3480,910 h60
  text "PP-017" at 4409.74,910 h60
  text "7.99mil" at 5009.6,910 h60
  text "4.3" at 5659.43,910 h60
  text "2" at 3070.09,790 h60
  text "Ground" at 3480,790 h60
  text "CF-004" at 4409.74,790 h60
  text "1.18mil" at 5009.6,790 h60
  text "Dielectric 3" at 3480,670 h60
  text "Core-039" at 4409.74,670 h60
  text "40.55mil" at 5009.6,670 h60
  text "4.8" at 5659.43,670 h60
  text "3" at 3070.09,550 h60
  text "Power" at 3480,550 h60
  text "CF-004" at 4409.74,550 h60
  text "1.18mil" at 5009.6,550 h60
  text "Dielectric 5" at 3480,430 h60
  text "PP-017" at 4409.74,430 h60
  text "7.99mil" at 5009.6,430 h60
  text "4.3" at 5659.43,430 h60
  text "4" at 3070.09,310 h60
  text "Bottom Layer" at 3480,310 h60
  text "CF-004" at 4409.74,310 h60
  text "1.38mil" at 5009.6,310 h60
  text "Bottom Solder" at 3480,190 h60
  text "SM-001" at 4409.74,190 h60
  text "0.79mil" at 5009.6,190 h60
  text "4" at 5659.43,190 h60
  text "Bottom Overlay" at 3480,70 h60
  text "Total board thickness:" at 3070.09,-50 h60
  text "63.23mil" at 5009.6,-50 h60
Mechanical 4:
  drawing of 8276 lines, arcs and shapes, not listed
Drill Drawing:
  circle w10: c-330.38,2681.28 r33.33
  lines w10: -363.71,2047.94 -297.04,2047.94 -297.04,2114.61 -363.71,2114.61 -363.71,2047.94 ; -363.71,2231.28 -330.38,2197.94 -297.04,2231.28 -330.38,2264.61 -363.71,2231.28 ; -363.71,2364.61 -347.04,2364.61 -330.38,2347.94 -313.71,2364.61 -297.04,2364.61 -313.71,2381.28 -297.04,2397.94 -313.71,2397.94 -330.38,2414.61 -347.04,2397.94 -363.71,2397.94 -347.04,2381.28 -363.71,2364.61 ; -363.71,2497.94 -330.38,2514.61 -297.04,2497.94 -313.71,2531.28 -297.04,2564.61 -330.38,2547.94 -363.71,2564.61 -347.04,2531.28 -363.71,2497.94 ; -363.71,2814.61 -347.04,2814.61 -330.38,2797.94 -313.71,2814.61 -297.04,2814.61 -313.71,2831.28 -297.04,2847.94 -313.71,2847.94 -330.38,2864.61 -347.04,2847.94 -363.71,2847.94 -347.04,2831.28 -363.71,2814.61 ; -363.71,2964.61 -347.04,2964.61 -347.04,2947.94 -313.71,2947.94 -313.71,2964.61 -297.04,2964.61 -297.04,2997.94 -313.71,2997.94 -313.71,3014.61 -347.04,3014.61 -347.04,2997.94 -363.71,2997.94 -363.71,2964.61 ; -363.71,3097.94 -363.71,3114.61 -347.04,3131.28 -363.71,3147.94 -363.71,3164.61 -347.04,3164.61 -330.38,3147.94 -313.71,3164.61 -297.04,3164.61 -297.04,3147.94 -313.71,3131.28 -297.04,3114.61 -297.04,3097.94 -313.71,3097.94 -330.38,3114.61 -347.04,3097.94 -363.71,3097.94 ; -363.71,3314.61 -297.04,3314.61 -330.38,3247.94 -363.71,3314.61 ; -363.71,3397.94 -297.04,3397.94 -297.04,3464.61 -363.71,3464.61 -363.71,3397.94 ; -350.38,2061.28 -310.38,2061.28 -310.38,2101.28 -350.38,2101.28 -350.38,2061.28 ; -350.38,2821.28 -340.38,2821.28 -330.38,2811.28 -320.38,2821.28 -310.38,2821.28 -320.38,2831.28 -310.38,2841.28 -320.38,2841.28 -330.38,2851.28 -340.38,2841.28 -350.38,2841.28 -340.38,2831.28 -350.38,2821.28
  lines w15: -423.5,2002.94 13054.7,2002.94 ; -423.5,3502.94 13054.7,3502.94 ; 127.38,1852.94 127.38,3652.94 ; 727.22,1852.94 727.22,3652.94 ; 1876.88,1852.94 1876.88,3652.94 ; 2382.76,1852.94 2382.76,3652.94 ; 3116.56,1852.94 3116.56,3652.94 ; 4616.11,1852.94 4616.11,3652.94 ; 5205.96,1852.94 5205.96,3652.94 ; 5951.76,1852.94 5951.76,3652.94 ; 7031.44,1852.94 7031.44,3652.94 ; 7885.21,1852.94 7885.21,3652.94 ; 9218.81,1852.94 9218.81,3652.94 ; 10552.42,1852.94 10552.42,3652.94 ; 11652.1,1852.94 11652.1,3652.94 ; -423.5,1852.94 13054.7,1852.94 13054.7,3652.94 -423.5,3652.94 -423.5,1852.94
  text "Symbol" at -333.5,3547.94 h72
  text "Count" at 172.38,3547.94 h72
  text "Hole Size" at 772.22,3547.94 h72
  text "Plated" at 1921.88,3547.94 h72
  text "Hole Type" at 2427.76,3547.94 h72
  text "Drill Layer Pair" at 3161.56,3547.94 h72
  text "Via/Pad" at 4661.11,3547.94 h72
  text "Pad Shape" at 5250.96,3547.94 h72
  text "Template" at 5996.76,3547.94 h72
  text "Description" at 7076.44,3547.94 h72
  text "Hole Tolerance (+)" at 7930.21,3547.94 h72
  text "Hole Tolerance (-)" at 9263.81,3547.94 h72
  text "Hole Length" at 10597.42,3547.94 h72
  text "Routed Path Length" at 11697.1,3547.94 h72
  text "1" at 172.38,3397.94 h60
  text "25.59mil (0.650mm)" at 772.22,3397.94 h60
  text "NPTH" at 1921.88,3397.94 h60
  text "Slot" at 2427.76,3397.94 h60
  text "Top Layer - Bottom Layer" at 3161.56,3397.94 h60
  text "Pad" at 4661.11,3397.94 h60
  text "Rounded" at 5250.96,3397.94 h60
  text "c0hn65_95" at 5996.76,3397.94 h60
  text "37.40mil (0.950mm)" at 10597.42,3397.94 h60
  text "11.81mil (0.300mm)" at 11697.1,3397.94 h60
  text "1" at 172.38,3247.94 h60
  text "26.58mil (0.675mm)" at 772.22,3247.94 h60
  text "NPTH" at 1921.88,3247.94 h60
  text "Round" at 2427.76,3247.94 h60
  text "Top Layer - Bottom Layer" at 3161.56,3247.94 h60
  text "Pad" at 4661.11,3247.94 h60
  text "Rounded" at 5250.96,3247.94 h60
  text "c0hn68" at 5996.76,3247.94 h60
  text "-" at 10597.42,3247.94 h60
  text "-" at 11697.1,3247.94 h60
  text "2" at 172.38,3097.94 h60
  text "37.40mil (0.950mm)" at 772.22,3097.94 h60
  text "NPTH" at 1921.88,3097.94 h60
  text "Round" at 2427.76,3097.94 h60
  text "Top Layer - Bottom Layer" at 3161.56,3097.94 h60
  text "Pad" at 4661.11,3097.94 h60
  text "Rounded" at 5250.96,3097.94 h60
  text "c0hn95" at 5996.76,3097.94 h60
  text "-" at 10597.42,3097.94 h60
  text "-" at 11697.1,3097.94 h60
  text "2" at 172.38,2947.94 h60
  text "40.16mil (1.020mm)" at 772.22,2947.94 h60
  text "NPTH" at 1921.88,2947.94 h60
  text "Round" at 2427.76,2947.94 h60
  text "Top Layer - Bottom Layer" at 3161.56,2947.94 h60
  text "Pad" at 4661.11,2947.94 h60
  text "Rounded" at 5250.96,2947.94 h60
  text "c0hn102" at 5996.76,2947.94 h60
  text "-" at 10597.42,2947.94 h60
  text "-" at 11697.1,2947.94 h60
  text "2" at 172.38,2797.94 h60
  text "70.87mil (1.800mm)" at 772.22,2797.94 h60
  text "NPTH" at 1921.88,2797.94 h60
  text "Round" at 2427.76,2797.94 h60
  text "Top Layer - Bottom Layer" at 3161.56,2797.94 h60
  text "Pad" at 4661.11,2797.94 h60
  text "Rounded" at 5250.96,2797.94 h60
  text "c220hn180" at 5996.76,2797.94 h60
  text "-" at 10597.42,2797.94 h60
  text "-" at 11697.1,2797.94 h60
  text "4" at 172.38,2647.94 h60
  text "19.69mil (0.500mm)" at 772.22,2647.94 h60
  text "PTH" at 1921.88,2647.94 h60
  text "Slot" at 2427.76,2647.94 h60
  text "Top Layer - Bottom Layer" at 3161.56,2647.94 h60
  text "Pad" at 4661.11,2647.94 h60
  text "Rounded" at 5250.96,2647.94 h60
  text "r160_80h50_110r40" at 5996.76,2647.94 h60
  text "43.31mil (1.100mm)" at 10597.42,2647.94 h60
  text "23.62mil (0.600mm)" at 11697.1,2647.94 h60
  text "4" at 172.38,2497.94 h60
  text "35.43mil (0.900mm)" at 772.22,2497.94 h60
  text "NPTH" at 1921.88,2497.94 h60
  text "Round" at 2427.76,2497.94 h60
  text "Top Layer - Bottom Layer" at 3161.56,2497.94 h60
  text "Pad" at 4661.11,2497.94 h60
  text "Rounded" at 5250.96,2497.94 h60
  text "c0hn90" at 5996.76,2497.94 h60
  text "-" at 10597.42,2497.94 h60
  text "-" at 11697.1,2497.94 h60
  text "4" at 172.38,2347.94 h60
  text "40.00mil (1.016mm)" at 772.22,2347.94 h60
  text "PTH" at 1921.88,2347.94 h60
  text "Round" at 2427.76,2347.94 h60
  text "Top Layer - Bottom Layer" at 3161.56,2347.94 h60
  text "Pad" at 4661.11,2347.94 h60
  text "Octagonal" at 5250.96,2347.94 h60
  text "s254h102c64" at 5996.76,2347.94 h60
  text "-" at 10597.42,2347.94 h60
  text "-" at 11697.1,2347.94 h60
  text "4" at 172.38,2197.94 h60
  text "145.67mil (3.700mm)" at 772.22,2197.94 h60
  text "PTH" at 1921.88,2197.94 h60
  text "Round" at 2427.76,2197.94 h60
  text "Top Layer - Bottom Layer" at 3161.56,2197.94 h60
  text "Pad" at 4661.11,2197.94 h60
  text "Rounded" at 5250.96,2197.94 h60
  text "c600h370" at 5996.76,2197.94 h60
  text "-" at 10597.42,2197.94 h60
  text "-" at 11697.1,2197.94 h60
  text "326" at 172.38,2047.94 h60
  text "11.81mil (0.300mm)" at 772.22,2047.94 h60
  text "PTH" at 1921.88,2047.94 h60
  text "Round" at 2427.76,2047.94 h60
  text "Top Layer - Bottom Layer" at 3161.56,2047.94 h60
  text "Via" at 4661.11,2047.94 h60
  text "Rounded" at 5250.96,2047.94 h60
  text "(Mixed)" at 5996.76,2047.94 h60
  text "-" at 10597.42,2047.94 h60
  text "-" at 11697.1,2047.94 h60
  text "350 Total" at 172.38,1897.94 h60
  text "Slot definitions :" at -333.5,1752.97 h60
  text "Routed Path Length" at 699.19,1752.97 h60
  text "= Calculated from tool start centre position to tool end centre position." at 1801.86,1752.97 h60
  text "Hole Length" at 699.19,1652.99 h60
  text "= Routed Path Length + Tool Size = Slot length as defined in the PCB layout" at 1391.99,1652.99 h60

## Dimensions
2601.32,1358.07 to 2601.32,-137.8 on Dimensions
-410.5,1338.39 to 2621,1338.39 on Dimensions
1358.16,452.76 to 2027.45,452.76 on Mechanical 4
2220.47,1080.71 to 2220.47,494.09 on Mechanical 4
1165.35,1080.71 to 2220.47,1080.71 on Mechanical 4

## Text inside footprints (layer, text, board x,y; h text height)
J2: Top Overlay "A1" at 73.55,144.75 h30
J3: Top Overlay "2" at 889.78,1215.09 h30 r180; Top Overlay "1" at 889.78,1070.09 h30 r180; Top Overlay "59" at 318.91,1070.09 h30 r180; Top Overlay "60" at 318.91,1215.09 h30 r180
J8: Bottom Overlay "PCB Edge" at -393.38,726.89 h15 r270
SW1: Bottom Overlay "PCB EDGE" at 2598.25,992.83 h10 r90
U6: Bottom Overlay "1" at 1286.94,1226.87 h27.56 r90; Bottom Overlay "6" at 893.24,1230.87 h27.56 r90; Bottom Overlay "7" at 866.94,310.87 h27.56 r90; Bottom Overlay "9" at 985.05,310.87 h27.56 r90; Bottom Overlay "12" at 1307.82,336.87 h27.56 r90